# Altium PCB ABPG.PcbDoc (part 2 of 2)
Units mm, origin at the board's own origin, x right, y up, seen from the top; angles counter-clockwise.
Board outline 54.5 x 112.5 mm, 4 copper layers (Top Layer, Layer 1, Layer 2, Bottom Layer), stack 0.603 mm thick; 177 components, 78 nets, 524 pads, 877 vias.
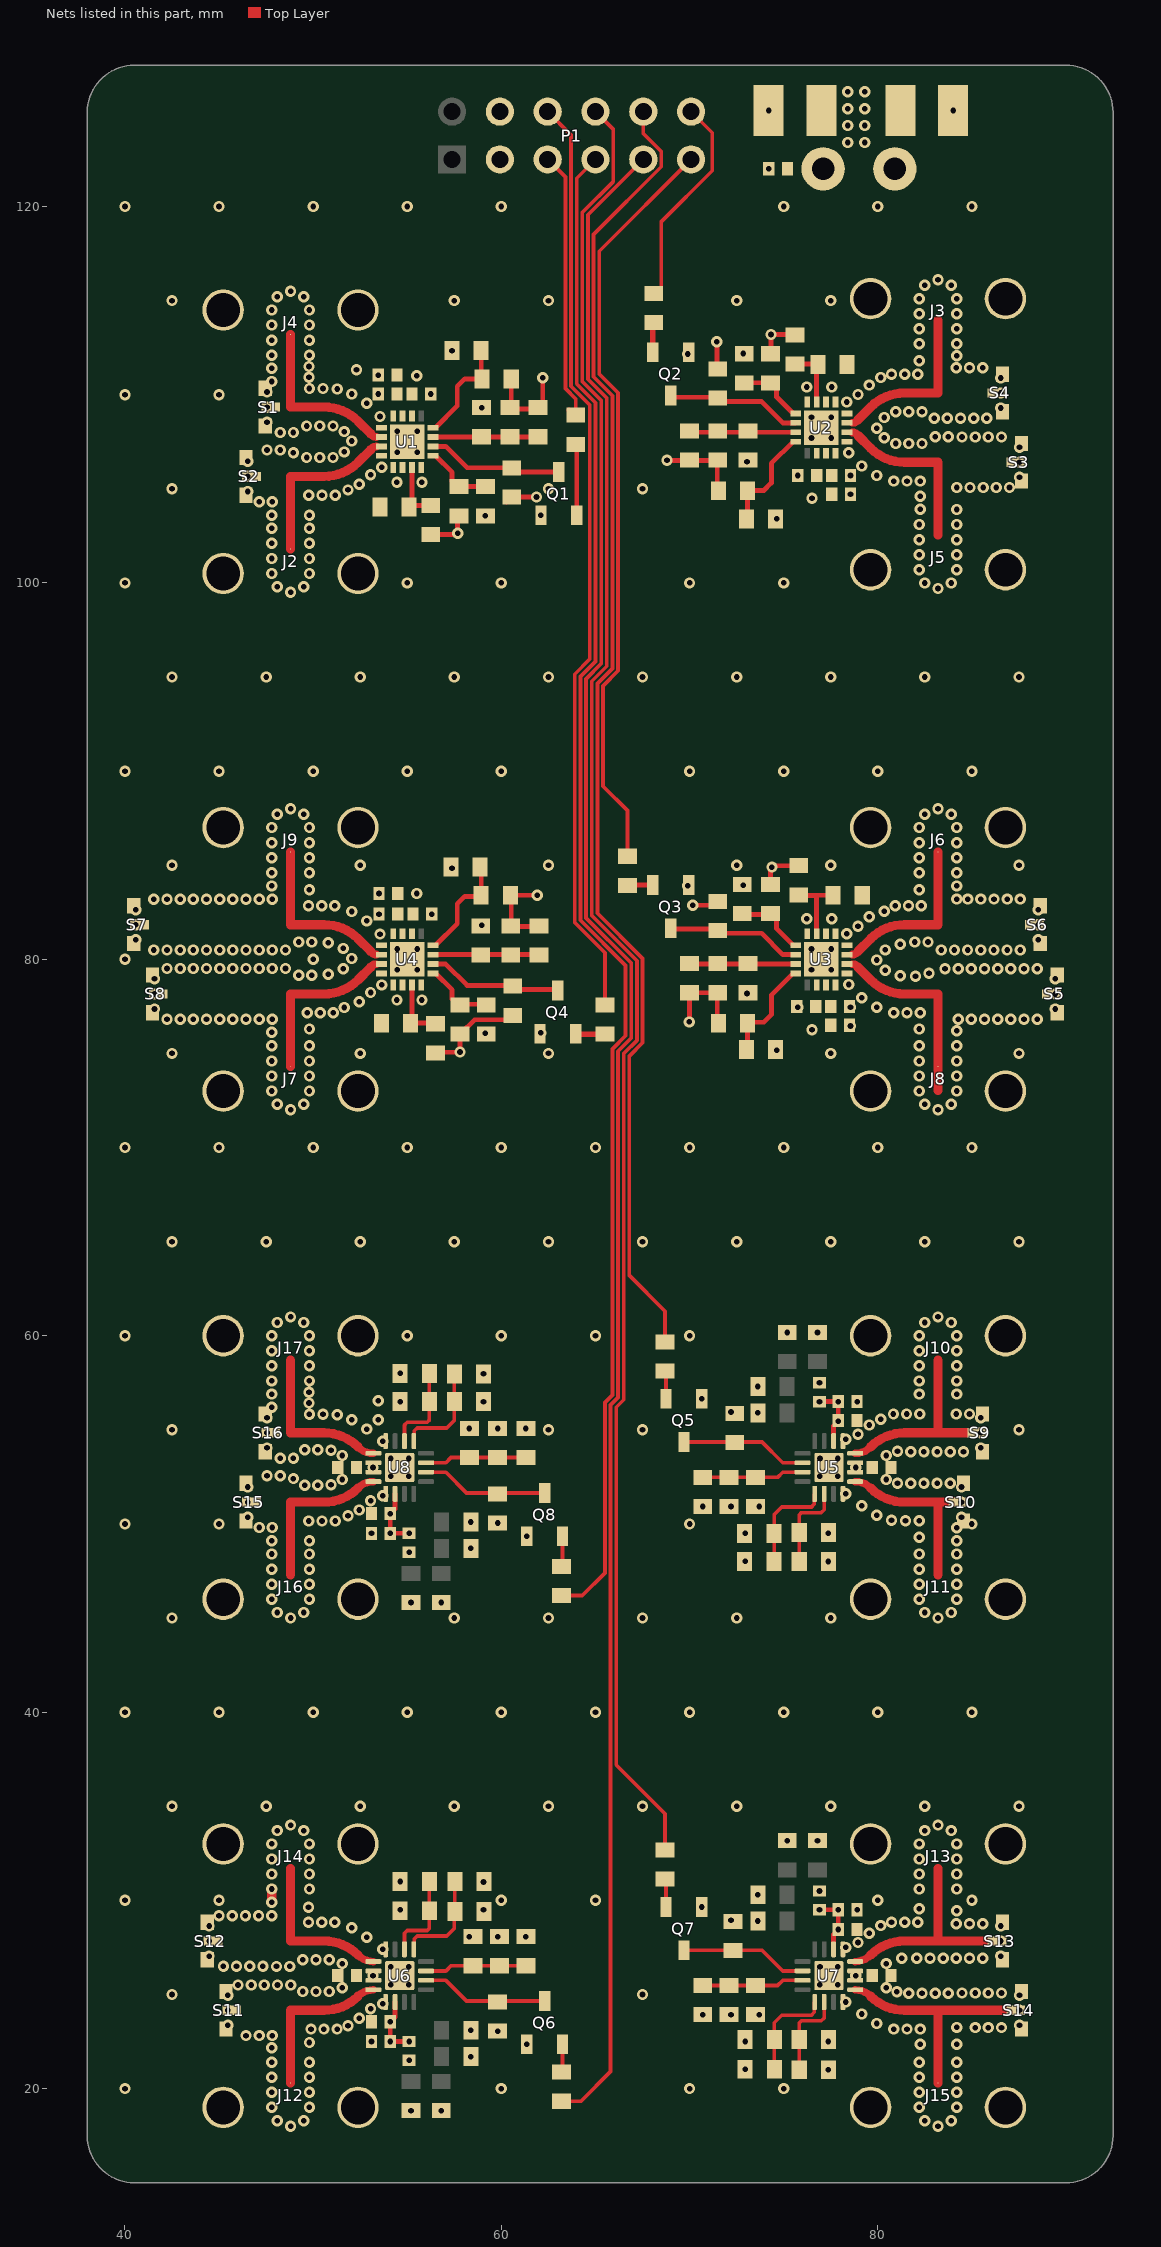
[diagram p4: the nets of this part, all layers, seen from the top]

## Via types
v1: diameter 0.6, hole 0.3, Top Layer to Bottom Layer, tented both sides, 877 vias

## Nets (pads, with @x,y where several pads share a name; then routed paths per layer and width w, separated by ;. In a path a pad name is that pad's centre, name@x,y a point inside that pad or via, vN(x,y) a via of type N, cw(c..) or ccw(c..) an arc to the next point about the centre after c; other vN are vias at no path point) (continued)
GND: C1.2 C2.2 C3.2 C4.2 C5.2 C6.2 C7.2 C8.2 C9.2 C12.2 C13.2 C14.2 C15.2 C16.2 C17.2 C24.2 C25.2 C26.2 C27.2 C28.2 C29.2 C30.2 C31.2 C32.2 C33.2 C34.2 C35.2 C36.2 C37.2 C38.2 C39.2 J1.2 J2.0 J3.0 J4.0 J5.0 J6.0 J7.0 J8.0 J9.0 J10.0 J11.0 J12.0 J13.0 J14.0 J15.0 J16.0 J17.0 P1.3 P1.4 Q1.1 Q2.1 Q3.1 Q4.1 Q5.1 Q6.1 Q7.1 Q8.1 R5.2 R6.2 R13.2 R14.2 R16.2 R17.2 R19.2 R20.2 R25.2 R26.2 R33.2 R34.2 R36.2 R37.2 R39.2 R40.2 R43.2 R44.1 R45.1 R46.2 R52.2 R55.2 R56.1 R57.1 R58.2 R63.2 R64.1 R68.2 R69.1 R70.2 R76.2 R79.2 R80.1 R81.1 R82.2 R88.2 S1.0 S2.0 S3.0 S4.0 S5.0 S6.0 S7.0 S8.0 S9.0 S10.0 S11.0 S12.0 S13.0 S14.0 S15.0 S16.0 U1.9 U1.12 U1.13 U1.14 U1.16 U2.9 U2.12 U2.13 U2.14 U2.16 U3.9 U3.12 U3.13 U3.14 U3.16 U4.9 U4.12 U4.13 U4.14 U4.16 U5.8 U5.13 U6.8 U6.13 U7.8 U7.13 U8.8 U8.13 | length 0.7
  Top Layer w0.5: v1(47.8,29.9) v1(47.8,30.6)
  other v1: 48.8,18 83.2,18 48.093,18.293 49.507,18.293 82.493,18.293 83.907,18.293 56.808,18.825 47.8,19 49.8,19 82.2,19 84.2,19 47.8,19.8 49.8,19.8 82.2,19.8 84.2,19.8 40,20 60,20 70,20 75,20 47.8,20.6 49.8,20.6 82.2,20.6 84.2,20.6 77.376,21.001 72.95,21.025 47.8,21.4 49.8,21.4 82.2,21.4 84.2,21.4 55.1,21.5 47.8,22.175 61.35,22.35 82.25,22.36 84.2,22.35 49.8,22.45 53.1,22.5 46.43,22.815 47.13,22.815 47.83,22.815 58.375,23.1 49.885,23.16 50.57,23.16 51.27,23.16 80.85,23.16 81.55,23.16 82.25,23.16 84.2,23.25 85.17,23.24 85.87,23.24 86.57,23.24 51.85,23.34 45.47,23.36 87.53,23.36 79.95,23.46 52.45,23.74 73.7,23.925 79.15,23.96 45.47,24.16 87.53,24.16 53.05,24.24 53.7,24.5 78.3,24.6 45.47,24.96 87.53,24.96 42.5,25 67.5,25 81.65,25.06 82.35,25.06 83.05,25.06 83.75,25.06 84.47,25.08 85.17,25.08 85.87,25.08 86.57,25.08 81.016,25.139 49.45,25.16 50.15,25.16 50.85,25.16 51.55,25.36 80.45,25.36 46.005,25.505 46.705,25.505 47.405,25.505 48.105,25.505 48.805,25.505 45.23,26.495 45.93,26.495 46.63,26.495 47.33,26.495 48.05,26.49 48.75,26.49 51.55,26.64 80.45,26.64 49.45,26.84 50.15,26.84 50.85,26.84 81.27,26.92 82.07,26.92 82.77,26.92 83.47,26.92 84.17,26.92 84.87,26.92 85.57,26.92 44.47,27.04 86.53,27.04 53.7,27.4 78.3,27.5 78.95,27.76 44.47,27.84 86.53,27.84 52.85,28.04 58.3,28.075 79.55,28.26 52.05,28.54 44.47,28.64 80.15,28.66 86.53,28.64 84.17,28.76 84.87,28.76 85.57,28.76 49.75,28.84 50.45,28.84 51.15,28.84 80.73,28.84 81.43,28.84 82.115,28.84 73.625,28.9 45,29.185 45.7,29.185 46.4,29.185 47.1,29.185 47.8,29.185 84.2,29.45 78.9,29.5 82.2,29.55 49.75,29.64 70.65,29.65 40,30 45,30 60,30 65,30 80,30 85,30 76.9,30.5 49.8,30.6 82.2,30.6 84.2,30.6 59.05,30.975 54.624,30.999 47.8,31.4 49.8,31.4 82.2,31.4 84.2,31.4 47.8,32.2 49.8,32.2 82.2,32.2 84.2,32.2 47.8,33 49.8,33 82.2,33 84.2,33 75.192,33.175 48.093,33.707 49.507,33.707 82.493,33.707 83.907,33.707 48.8,34 83.2,34 42.5,35 47.5,35 52.5,35 57.5,35 62.5,35 67.5,35 72.5,35 77.5,35 82.5,35 87.5,35 40,40 45,40 50,40 55,40 60,40 65,40 70,40 75,40 80,40 85,40 42.5,45 48.8,45 57.5,45 62.5,45 67.5,45 72.5,45 77.5,45 83.2,45 48.093,45.293 49.507,45.293 82.493,45.293 83.907,45.293 56.808,45.825 47.8,46 49.8,46 82.2,46 84.2,46 47.8,46.8 49.8,46.8 82.2,46.8 84.2,46.8 47.8,47.6 49.8,47.6 82.2,47.6 84.2,47.6 77.376,48.001 72.95,48.025 47.8,48.4 49.8,48.4 82.2,48.4 84.2,48.4 55.1,48.5 47.8,49.1 49.8,49.1 84.2,49.1 82.2,49.3 61.35,49.35 53.1,49.5 47.13,49.81 47.83,49.81 84.2,49.8 40,50 45,50 70,50 85,50 58.375,50.1 49.77,50.16 50.47,50.16 51.17,50.16 81.475,50.175 82.2,50.175 80.725,50.2 46.53,50.36 84.45,50.36 51.85,50.44 79.95,50.46 52.45,50.74 73.7,50.925 79.15,50.96 46.53,51.16 84.45,51.16 53.05,51.24 53.7,51.5 78.3,51.6 46.53,51.96 84.45,51.96 49.55,52.06 50.25,52.06 50.95,52.085 81.05,52.16 81.75,52.16 82.45,52.16 83.15,52.16 83.85,52.16 51.55,52.36 80.45,52.36 48.95,52.41 47.55,52.56 48.25,52.56 48.25,53.49 48.95,53.49 51.55,53.64 80.45,53.64 81.05,53.86 81.75,53.84 82.45,53.84 83.15,53.84 83.85,53.84 84.55,53.84 50.95,53.915 49.55,53.94 50.25,53.94 47.55,54.04 85.47,54.04 53.7,54.4 78.3,54.5 78.95,54.76 47.55,54.84 85.47,54.84 42.5,55 62.5,55 67.5,55 87.5,55 52.85,55.04 58.3,55.075 79.55,55.26 52.05,55.54 53.45,55.54 80.15,55.56 47.55,55.64 85.47,55.64 51.275,55.8 49.8,55.825 50.525,55.825 80.83,55.84 81.53,55.84 82.23,55.84 84.17,55.84 84.87,55.84 73.625,55.9 47.8,56.2 49.775,56.425 78.9,56.5 53.45,56.54 70.65,56.65 47.8,56.9 82.2,56.9 84.2,56.9 49.775,57 76.9,57.5 47.8,57.6 49.8,57.6 82.2,57.6 84.2,57.6 59.05,57.975 54.624,57.999 47.8,58.4 49.8,58.4 82.2,58.4 84.2,58.4 47.8,59.2 49.8,59.2 82.2,59.2 84.2,59.2 40,60 47.8,60 49.8,60 55,60 60,60 65,60 70,60 82.2,60 84.2,60 75.192,60.175 48.093,60.707 49.507,60.707 82.493,60.707 83.907,60.707 48.8,61 83.2,61 42.5,65 47.5,65 52.5,65 57.5,65 62.5,65 67.5,65 72.5,65 77.5,65 82.5,65 87.5,65 40,70 45,70 50,70 55,70 60,70 65,70 70,70 75,70 80,70 85,70 48.8,72 83.2,72 48.093,72.293 49.507,72.293 82.493,72.293 83.907,72.293 47.8,73 49.8,73 82.2,73 84.2,73 47.8,73.8 49.8,73.8 82.2,73.8 84.2,73.8 47.8,74.6 49.8,74.6 82.2,74.6 84.2,74.6 42.5,75 52.5,75 62.5,75 77.5,75 87.5,75 74.625,75.16 47.8,75.4 49.8,75.4 82.2,75.4 84.2,75.4 59.15,76.065 62.1,76.09 47.8,76.125 84.2,76.2 49.8,76.3 82.2,76.3 78.55,76.46 42.23,76.81 42.93,76.81 43.63,76.81 44.33,76.81 45.03,76.81 45.73,76.81 46.43,76.81 47.13,76.81 47.83,76.81 84.27,76.815 84.97,76.815 85.67,76.815 86.37,76.815 87.07,76.815 87.77,76.815 88.47,76.815 49.685,77.16 50.37,77.16 51.07,77.16 80.85,77.16 81.55,77.16 82.25,77.16 41.57,77.36 89.43,77.36 51.65,77.44 75.75,77.46 78.55,77.46 79.95,77.46 52.45,77.74 54.45,77.84 55.777,77.84 79.15,77.96 41.57,78.16 89.43,78.16 73.05,78.185 53.05,78.24 53.65,78.64 78.45,78.66 41.57,78.96 89.43,78.96 82,79.1 81.2,79.12 49.23,79.16 49.93,79.16 50.8,79.2 82.72,79.255 80.4,79.42 42.23,79.51 42.93,79.51 43.63,79.51 44.33,79.51 45.03,79.51 45.73,79.51 46.43,79.51 47.13,79.51 47.83,79.51 48.53,79.51 51.6,79.5 83.57,79.505 84.27,79.505 84.97,79.505 85.67,79.505 86.37,79.505 87.07,79.505 87.77,79.505 88.47,79.505 79.95,79.96 40,80 50,80 52.05,80.04 41.53,80.495 42.23,80.495 42.93,80.495 43.63,80.495 44.33,80.495 45.03,80.495 45.73,80.495 46.43,80.495 47.13,80.495 47.83,80.495 48.53,80.495 80.4,80.5 83.37,80.495 84.07,80.495 84.77,80.495 85.47,80.495 86.17,80.495 86.87,80.495 87.57,80.495 51.6,80.58 81.2,80.8 50.8,80.88 49.23,80.92 49.93,80.92 81.97,80.92 82.67,80.92 40.57,81.04 88.53,81.04 53.55,81.34 78.35,81.36 78.95,81.76 58.95,81.815 40.57,81.84 88.53,81.84 52.85,82.04 76.223,82.16 77.55,82.16 79.55,82.26 53.5,82.4 56.3,82.4 52.05,82.54 80.35,82.56 40.57,82.64 88.53,82.64 49.75,82.84 50.45,82.84 51.15,82.84 80.93,82.84 81.63,82.84 82.315,82.84 41.53,83.185 42.23,83.185 42.93,83.185 43.63,83.185 44.33,83.185 45.03,83.185 45.73,83.185 46.43,83.185 47.13,83.185 47.83,83.185 84.2,83.2 84.775,83.2 85.475,83.2 86.175,83.2 86.875,83.2 87.575,83.2 53.5,83.5 49.8,83.7 82.2,83.7 47.8,83.9 84.2,83.9 69.9,83.91 72.85,83.935 47.8,84.6 49.8,84.6 82.2,84.6 84.2,84.6 57.375,84.84 42.5,85 52.5,85 62.5,85 72.5,85 77.5,85 87.5,85 47.8,85.4 49.8,85.4 82.2,85.4 84.2,85.4 47.8,86.2 49.8,86.2 82.2,86.2 84.2,86.2 47.8,87 49.8,87 82.2,87 84.2,87 48.093,87.707 49.507,87.707 82.493,87.707 83.907,87.707 48.8,88 83.2,88 40,90 45,90 50,90 55,90 60,90 70,90 75,90 80,90 85,90 42.5,95 47.5,95 52.5,95 57.5,95 62.5,95 67.5,95 72.5,95 77.5,95 82.5,95 87.5,95 48.8,99.5 83.2,99.7 48.093,99.793 49.507,99.793 40,100 55,100 60,100 70,100 75,100 82.493,99.993 83.907,99.993 47.8,100.5 49.8,100.5 82.2,100.7 84.2,100.7 47.8,101.3 49.8,101.3 82.2,101.5 84.2,101.5 47.8,102.1 49.8,102.1 82.2,102.3 84.2,102.3 47.8,102.9 49.8,102.9 82.2,103.1 84.2,103.1 74.625,103.41 59.15,103.565 62.1,103.59 47.8,103.6 49.8,103.6 82.25,103.91 84.2,103.9 47.13,104.31 47.83,104.31 82.25,104.61 49.77,104.66 50.47,104.66 51.17,104.66 78.55,104.71 46.53,104.86 51.85,104.94 42.5,105 62.5,105 67.5,105 84.2,105.065 84.9,105.065 85.6,105.065 86.3,105.065 87,105.065 52.45,105.24 54.45,105.34 55.777,105.34 80.85,105.41 81.55,105.41 82.25,105.41 87.53,105.61 46.53,105.66 75.75,105.71 78.55,105.71 79.95,105.71 53.05,105.74 53.65,106.14 79.15,106.21 87.53,106.41 73.05,106.435 46.53,106.46 49.65,106.66 50.35,106.66 51.05,106.66 48.95,106.91 78.45,106.91 51.65,106.96 47.55,107.06 48.25,107.06 87.53,107.21 80.95,107.41 81.65,107.41 82.35,107.41 52.05,107.54 80.35,107.71 84.47,107.755 85.17,107.755 85.87,107.755 86.57,107.755 83.05,107.76 83.75,107.76 48.25,107.99 48.95,107.99 51.65,108.04 79.95,108.21 49.65,108.34 50.35,108.34 51.05,108.34 47.55,108.54 82.995,108.745 83.695,108.745 84.395,108.745 85.095,108.745 85.795,108.745 80.35,108.79 53.55,108.84 80.95,109.09 81.65,109.09 82.35,109.09 86.53,109.29 58.95,109.315 47.55,109.34 52.85,109.54 78.35,109.61 40,110 45,110 78.95,110.01 52.05,110.04 53.45,110.04 56.25,110.04 86.53,110.09 47.55,110.14 51.275,110.3 49.8,110.325 50.525,110.325 76.223,110.41 77.55,110.41 79.55,110.51 47.8,110.7 86.53,110.89 49.775,110.925 80.15,110.91 53.45,111.04 80.73,111.09 81.43,111.09 82.115,111.09 52.3,111.325 47.8,111.4 84.17,111.435 84.87,111.435 85.57,111.435 49.775,111.5 82.2,111.8 84.2,112.075 47.8,112.1 49.8,112.1 69.9,112.16 72.85,112.185 57.375,112.34 82.2,112.7 84.2,112.7 47.8,112.9 49.8,112.9 82.2,113.5 84.2,113.5 47.8,113.7 49.8,113.7 82.2,114.3 84.2,114.3 47.8,114.5 49.8,114.5 42.5,115 57.5,115 62.5,115 72.5,115 77.5,115 82.2,115.1 84.2,115.1 48.093,115.207 49.507,115.207 48.8,115.5 82.493,115.807 83.907,115.807 83.2,116.1 40,120 45,120 50,120 55,120 60,120 75,120 80,120 85,120 74.2,122 74.2,125.1 84,125.1
NetC10_2: C10.2 R3.1 R5.1 U1.3 | length 5.6
  Top Layer w0.254: U1.3@56.36,107.75 61.935,107.75 C10.2@61.95,107.765
NetC11_2: C11.2 R4.1 R6.1 U2.3 | length 5.6
  Top Layer w0.254: C11.2@70.065,108 U2.3@75.64,108
NetC18_2: C18.2 R23.1 R25.1 U3.3 | length 5.6
  Top Layer w0.254: C18.2@70.065,79.75 71.5,79.75 73.1,79.75 U3.3@75.64,79.75
NetC19_2: C19.2 R24.1 R26.1 U4.3 | length 5.6
  Top Layer w0.254: U4.3@56.36,80.25 C19.2@61.935,80.25
NetC20_1: C20.1 R51.1 R52.1 U5.3 | length 5.4
  Top Layer w0.2: C20.1@70.7,52.475 74.675,52.475 74.95,52.75 U5.3@76,52.75
NetC21_1: C21.1 R67.1 R68.1 U6.3 | length 5.4
  Top Layer w0.2: U6.3@56,26.25 57.05,26.25 57.325,26.525 R68.1@58.5,26.525 R67.1@59.9,26.525 C21.1@61.3,26.525
NetC22_1: C22.1 R75.1 R76.1 U7.3 | length 5.4
  Top Layer w0.2: C22.1@70.7,25.475 R75.1@72.1,25.475 73.6,25.475 74.675,25.475 74.95,25.75 U7.3@76,25.75
NetC23_1: C23.1 R87.1 R88.1 U8.3 | length 5.4
  Top Layer w0.2: U8.3@56,53.25 57.05,53.25 57.325,53.525 58.4,53.525 R87.1@59.8,53.525 C23.1@61.3,53.525
NetJ2_1: J2.1 S2.1 U1.11 | length 8.9
  Top Layer w0.41: 53.055,107.079 cw(c53.35,106.9) U1.11@53.35,107.245
  Top Layer w0.49: J2.1@48.8,101.8 48.8,105.66 50.584,105.66 ccw(c50.584,108.2) 52.38,106.404 53.055,107.079
NetJ3_1: J3.1 S4.1 U2.11 | length 8.9
  Top Layer w0.41: U2.11@78.65,108.505 ccw(c78.65,108.85) 78.945,108.671
  Top Layer w0.49: 78.945,108.671 79.62,109.346 cw(c81.416,107.55) 81.416,110.09 83.2,110.09 83.2,113.95
NetJ4_1: J4.1 S1.1 U1.10 | length 8.9
  Top Layer w0.41: 53.055,107.921 ccw(c53.35,108.1) U1.10@53.35,107.755
  Top Layer w0.49: J4.1@48.8,113.2 48.8,109.34 50.584,109.34 cw(c50.584,106.8) 52.38,108.596 53.055,107.921
NetJ5_1: J5.1 S3.1 U2.10 | length 8.9
  Top Layer w0.41: U2.10@78.65,107.995 cw(c78.65,107.65) 78.945,107.829
  Top Layer w0.49: 78.945,107.829 79.62,107.154 ccw(c81.416,108.95) 81.416,106.41 83.2,106.41 83.2,102.55
NetJ6_1: J6.1 S6.1 U3.11 | length 8.9
  Top Layer w0.41: U3.11@78.65,80.255 ccw(c78.65,80.6) 78.945,80.421
  Top Layer w0.49: 78.945,80.421 79.62,81.096 cw(c81.416,79.3) 81.416,81.84 83.2,81.84 J6.1@83.2,85.7
NetJ7_1: J7.1 S8.1 U4.11 | length 8.9
  Top Layer w0.41: 53.055,79.579 cw(c53.35,79.4) U4.11@53.35,79.745
  Top Layer w0.49: J7.1@48.8,74.3 48.8,78.16 50.584,78.16 ccw(c50.584,80.7) 52.38,78.904 53.055,79.579
NetJ8_1: J8.1 S5.1 U3.10 | length 10.2
  Top Layer w0.41: U3.10@78.65,79.745 cw(c78.65,79.4) 78.945,79.579
  Top Layer w0.49: 78.945,79.579 79.62,78.904 ccw(c81.416,80.7) 81.416,78.16 83.2,78.16 J8.1@83.2,74.3 83.2,73.025
NetJ9_1: J9.1 S7.1 U4.10 | length 8.9
  Top Layer w0.41: 53.055,80.421 ccw(c53.35,80.6) U4.10@53.35,80.255
  Top Layer w0.49: J9.1@48.8,85.7 48.8,81.84 50.584,81.84 cw(c50.584,79.3) 52.38,81.096 53.055,80.421
NetJ10_1: J10.1 S9.1 U5.12 | length 10.2
  Top Layer w0.4: U5.12@78.8,53.75 ccw(c78.8,54.894) 79.609,54.085
  Top Layer w0.49: 79.62,54.096 cw(c81.416,52.3) 81.416,54.84 83.2,54.84 ; J10.1@83.2,58.7 83.2,54.84 ; S9.1@84.84,54.84 83.2,54.84
NetJ11_1: J11.1 S10.1 U5.9 | length 9.4
  Top Layer w0.4: U5.9@78.8,52.25 cw(c78.8,51.106) 79.609,51.915
  Top Layer w0.49: 79.609,51.915 79.62,51.904 ccw(c81.416,53.7) 81.416,51.16 83.2,51.16 ; J11.1@83.2,47.3 83.2,51.16 ; S10.1@84,51.16 83.2,51.16
NetJ12_1: J12.1 S11.1 U6.12 | length 8.5
  Top Layer w0.4: 52.391,24.915 cw(c53.2,24.106) U6.12@53.2,25.25
  Top Layer w0.49: J12.1@48.8,20.3 48.8,24.16 50.584,24.16 ccw(c50.584,26.7) 52.38,24.904
NetJ13_1: J13.1 S13.1 U7.12 | length 11.3
  Top Layer w0.4: U7.12@78.8,26.75 ccw(c78.8,27.894) 79.609,27.085
  Top Layer w0.49: 79.62,27.096 cw(c81.416,25.3) 81.416,27.84 83.2,27.84 ; J13.1@83.2,31.7 83.2,27.84 ; S13.1@86,27.84 83.2,27.84
NetJ14_1: J14.1 S12.1 U6.9 | length 8.5
  Top Layer w0.4: 52.391,27.085 ccw(c53.2,27.894) U6.9@53.2,26.75
  Top Layer w0.49: J14.1@48.8,31.7 48.8,27.84 50.584,27.84 cw(c50.584,25.3) 52.38,27.096
NetJ15_1: J15.1 S14.1 U7.9 | length 12.3
  Top Layer w0.4: U7.9@78.8,25.25 cw(c78.8,24.106) 79.609,24.915
  Top Layer w0.49: 79.62,24.904 ccw(c81.416,26.7) 81.416,24.16 83.2,24.16 ; J15.1@83.2,20.3 83.2,24.16 ; S14.1@87,24.16 83.2,24.16
NetJ16_1: J16.1 S15.1 U8.12 | length 8.5
  Top Layer w0.4: 52.391,51.915 cw(c53.2,51.106) U8.12@53.2,52.25
  Top Layer w0.49: J16.1@48.8,47.3 48.8,51.16 50.584,51.16 ccw(c50.584,53.7) 52.38,51.904
NetJ17_1: J17.1 S16.1 U8.9 | length 8.5
  Top Layer w0.4: 52.391,54.085 ccw(c53.2,54.894) U8.9@53.2,53.75
  Top Layer w0.49: J17.1@48.8,58.7 48.8,54.84 50.584,54.84 cw(c50.584,52.3) 52.38,54.096
NetQ1_2: Q1.2 R1.1 | length 3.8
  Top Layer w0.254: R1.1@63.95,107.365 64,107.315 64,103.917 Q1.2@64,103.59
NetQ1_3: Q1.3 R11.1 U1.2 | length 7.3
  Top Layer w0.254: U1.2@56.36,107.25 57.04,107.25 58.175,106.115 R11.1@60.55,106.115 60.775,105.89 Q1.3@63.05,105.89
NetQ2_2: Q2.2 R2.1 | length 1.7
  Top Layer w0.3: Q2.2@68,112.2 Q2.2@68.05,112.25 68.05,113.775 R2.1@68.1,113.825
NetQ2_3: Q2.3 R12.1 U2.2 | length 7.3
  Top Layer w0.254: Q2.3@68.95,109.86 71.225,109.86 71.45,109.635 73.825,109.635 74.96,108.5 U2.2@75.64,108.5
NetQ3_2: Q3.2 R21.1 | length 1.4
  Top Layer w0.254: R21.1@66.7,83.925 66.725,83.95 Q3.2@68.05,83.95
NetQ3_3: Q3.3 R31.1 U3.2 | length 7.3
  Top Layer w0.254: Q3.3@68.95,81.61 71.225,81.61 71.45,81.385 73.825,81.385 74.96,80.25 U3.2@75.64,80.25
NetQ4_2: Q4.2 R22.1 | length 1.6
  Top Layer w0.3: Q4.2@63.95,76.05 63.975,76.025 R22.1@65.5,76.025
NetQ4_3: Q4.3 R32.1 U4.2 | length 7.3
  Top Layer w0.254: U4.2@56.36,79.75 57.04,79.75 58.175,78.615 60.55,78.615 60.775,78.39 Q4.3@63.05,78.39
NetQ5_2: Q5.2 R41.1 | length 1.5
  Top Layer w0.2: R41.1@68.7,58.125 68.75,58.075 Q5.2@68.75,56.65
NetQ5_3: Q5.3 R42.1 U5.2 | length 6.8
  Top Layer w0.2: Q5.3@69.7,54.35 73.85,54.35 74.95,53.25 U5.2@76,53.25
NetQ6_2: Q6.2 R53.1 | length 1.5
  Top Layer w0.2: R53.1@63.2,20.875 63.25,20.925 Q6.2@63.25,22.35
NetQ6_3: Q6.3 R54.1 U6.2 | length 6.8
  Top Layer w0.2: U6.2@56,25.75 57.05,25.75 58.15,24.65 Q6.3@62.3,24.65
NetQ7_2: Q7.2 R59.1 | length 1.5
  Top Layer w0.2: R59.1@68.7,31.125 68.75,31.075 Q7.2@68.75,29.65
NetQ7_3: Q7.3 R60.1 U7.2 | length 6.8
  Top Layer w0.2: Q7.3@69.7,27.35 71.5,27.35 72.3,27.35 73.85,27.35 74.95,26.25 U7.2@76,26.25
NetQ8_2: Q8.2 R77.1 | length 1.6
  Top Layer w0.2: R77.1@63.2,47.75 63.25,47.8 Q8.2@63.25,49.35
NetQ8_3: Q8.3 R78.1 U8.2 | length 6.8
  Top Layer w0.2: U8.2@56,52.75 57.05,52.75 58.15,51.65 Q8.3@62.3,51.65
NetR15_1: R15.1 R19.1 U1.15 | length 3.3
  Top Layer w0.254: R19.1@55.1,104.04 55.1,104.115 R19.1@55.25,104.115 ; U1.15@55.25,106.14 R19.1@55.25,104.115 ; R15.1@56.25,104.115 R19.1@55.25,104.115
NetR18_1: R18.1 R20.1 U2.15 | length 3
  Top Layer w0.254: R18.1@75.75,111.635 76.75,111.635 U2.15@76.75,109.61
NetR35_1: R35.1 R39.1 U3.15 | length 3.9
  Top Layer w0.254: R35.1@75.75,83.385 76.75,83.385 ; U3.15@76.75,81.36 76.75,83.385 ; R39.1@77.625,83.4 76.765,83.4 76.75,83.385
NetR38_1: R38.1 R40.1 U4.15 | length 3
  Top Layer w0.254: U4.15@55.25,78.64 55.25,76.615 R38.1@56.25,76.615
PULSE_DRIVE_1: P1.5 R1.2 | length 14.7
  Top Layer w0.2: P1.5@62.46,122.5 63.4,121.56 63.4,110.327 63.95,109.777 R1.2@63.95,108.915
  Top Layer w0.3: R1.2@63.6,109.165 63.85,108.915 R1.2@63.95,108.915
PULSE_DRIVE_2: P1.6 R22.2 | length 49.4
  Top Layer w0.2: P1.6@62.46,125.04 63.7,123.8 63.7,110.451 64.7,109.451 64.7,95.949 63.9,95.149 63.9,81.951 65.5,80.351 R22.2@65.5,77.575
PULSE_DRIVE_3: P1.12 R2.2 | length 11.5
  Top Layer w0.2: R2.2@68.1,115.375 68.2,115.375 68.5,115.675 68.5,119.2 71.2,121.9 71.2,123.92 P1.12@70.08,125.04
PULSE_DRIVE_4: P1.11 R21.2 | length 40.4
  Top Layer w0.2: R21.2@66.7,85.475 66.7,87.9 65.4,89.2 65.4,94.527 66.2,95.327 66.2,110.1 65.2,111.1 65.2,117.62 P1.11@70.08,122.5
  Top Layer w0.3: R21.2@66.7,85.475 R21.2@66.8,85.475
PULSE_DRIVE_5: P1.9 R59.2 | length 94.3
  Top Layer w0.2: P1.9@67.54,122.5 64.6,119.56 64.6,110.824 65.6,109.824 65.6,95.576 64.8,94.776 64.8,82.324 65.712,81.412 67.2,79.924 67.2,75.694 66.5,74.994 66.5,56.6 66.1,56.2 66.1,37.2 68.7,34.6 R59.2@68.7,32.675
PULSE_DRIVE_6: P1.7 R77.2 | length 80.5
  Top Layer w0.2: R77.2@63.2,46.2 64.3,46.2 65.5,47.4 65.5,56.449 65.9,56.849 65.9,75.242 66.6,75.942 66.6,79.676 64.2,82.076 64.2,95.024 65,95.824 65,109.576 64,110.576 64,121.5 P1.7@65,122.5
PULSE_DRIVE_7: P1.10 R41.2 | length 70.1
  Top Layer w0.2: P1.10@67.54,125.04 67.54,123.872 68.49,122.922 68.49,122.106 64.9,118.516 64.9,110.949 65.9,109.949 65.9,95.451 65.1,94.651 65.1,82.449 67.5,80.049 67.5,75.569 66.8,74.869 66.8,63.2 68.7,61.3 R41.2@68.7,59.675
PULSE_DRIVE_8: P1.8 R53.2 | length 110.7
  Top Layer w0.2: R53.2@63.2,19.325 64.225,19.325 65.8,20.9 65.8,56.324 66.2,56.724 66.2,75.118 66.9,75.818 66.9,79.8 64.5,82.2 64.5,94.9 65.3,95.7 65.3,109.7 64.3,110.7 64.3,119.684 65.95,121.334 65.95,124.09 P1.8@65,125.04
S1_N: R70.1 R74.1 U7.6 | length 4.8
  Top Layer w0.2: R70.1@75.826,21.001 75.826,22.552 75.826,23.483 75.943,23.6 77,23.6 77.15,23.75 U7.6@77.15,24.6
S1_P: R69.2 R73.2 U7.5 | length 5.4
  Top Layer w0.2: R69.2@74.5,21.025 74.5,23.5 74.9,23.9 76.472,23.9 76.625,24.053 U7.5@76.625,24.575
S2_N: R82.1 R86.1 U8.6 | length 4.8
  Top Layer w0.2: U8.6@54.85,54.4 54.85,55.25 55,55.4 56.057,55.4 56.174,55.517 56.174,56.448 R82.1@56.174,57.999
S2_P: R81.2 R85.2 U8.5 | length 5.4
  Top Layer w0.2: U8.5@55.375,54.425 55.375,54.947 55.528,55.1 57.1,55.1 57.5,55.5 R81.2@57.5,57.975
S3_N: R46.1 R50.1 U5.6 | length 4.8
  Top Layer w0.2: R46.1@75.825,48 75.826,48.001 R50.1@75.826,49.552 75.826,50.483 75.943,50.6 77,50.6 77.15,50.75 U5.6@77.15,51.6
S3_P: R45.2 R49.2 U5.5 | length 5.4
  Top Layer w0.2: R45.2@74.475,48 74.5,48.025 74.5,50.5 74.9,50.9 76.472,50.9 76.625,51.053 76.625,51.575 U5.5@76.65,51.6
S4_N: R58.1 R66.1 U6.6 | length 4.8
  Top Layer w0.2: U6.6@54.85,27.4 54.85,28.25 55,28.4 56.057,28.4 56.174,28.517 R66.1@56.174,29.448 R58.1@56.174,30.999
S4_P: R57.2 R65.2 U6.5 | length 5.4
  Top Layer w0.2: U6.5@55.375,27.425 55.375,27.947 55.528,28.1 57.1,28.1 57.5,28.5 R65.2@57.5,29.4 ; R65.2@57.525,29.4 R57.2@57.525,31
VEE: C1.1 C2.1 C3.1 C4.1 C5.1 C6.1 C7.1 C8.1 C9.1 C10.1 C11.1 C12.1 C13.1 C14.1 C15.1 C16.1 C17.1 C18.1 C19.1 C20.2 C21.2 C22.2 C23.2 C24.1 C25.1 C26.1 C27.1 C28.1 C29.1 C30.1 C31.1 C32.1 C33.1 C34.1 C35.1 C36.1 C37.1 C38.1 C39.1 J1.1 R3.2 R4.2 R7.1 R8.1 R9.1 R10.1 R11.2 R12.2 R15.2 R18.2 R23.2 R24.2 R27.1 R28.1 R29.1 R30.1 R31.2 R32.2 R35.2 R38.2 R42.2 R47.2 R48.1 R49.1 R50.2 R51.2 R54.2 R60.2 R61.2 R62.1 R65.1 R66.2 R67.2 R71.2 R72.1 R73.1 R74.2 R75.2 R78.2 R83.2 R84.1 R85.1 R86.2 R87.2 U1.6 U1.7 U1.8 U1.17 U2.6 U2.7 U2.8 U2.17 U3.6 U3.7 U3.8 U3.17 U4.6 U4.7 U4.8 U4.17 U5.10 U5.11 U5.14 U5.17 U6.10 U6.11 U6.14 U6.17 U7.10 U7.11 U7.14 U7.17 U8.10 U8.11 U8.14 U8.17 | length 48.5
  Top Layer w0.254: C29.1@54.1,23.5 v1(54.1,22.5) v1(55.1,22.5) ; v1(54.1,23.55) 54.35,23.8 U6.14@54.35,24.6 ; C35.1@54.1,50.5 v1(54.1,49.5) v1(55.1,49.5) ; v1(54.1,50.55) 54.35,50.8 U8.14@54.35,51.6 ; R38.2@56.25,75.065 57.8,75.065 v1@57.81,75.075 ; R15.2@56.25,102.565 57.601,102.565 v1(57.676,102.639) 57.676,103.491 R7.1@57.75,103.565 ; v1(57.8,75.075) R29.1@57.8,76.025 ; R29.1@57.85,76.065 58.577,76.792 60.277,76.792 R32.2@60.55,77.065 ; R11.2@60.277,104.292 R11.2@60.55,104.565 v1(61.863,104.565) ; R30.1@60.475,83.4 v1(61.9,83.4) ; R24.2@60.525,81.74 C19.1@62,81.74 ; R24.2@60.525,81.89 R30.1@60.525,83.34 ; R8.1@60.525,110.84 60.525,109.39 R3.2@60.45,109.315 60.525,109.24 C10.1@61.95,109.24 ; C10.1@61.95,109.315 62.2,109.565 v1(62.2,110.9) ; v1(68.8,106.51) R4.2@71.475,106.51 ; v1(69.975,76.675) 70,76.7 C18.1@70,78.225 71.36,78.225 71.475,78.11 R28.1@71.475,76.66 ; v1(70.175,82.875) 71.3,82.875 R31.2@71.5,83.075 ; v1(71.45,112.81) 71.45,111.185 R12.2@71.723,111.458 ; R10.1@71.475,104.91 R4.2@71.475,106.36 ; R27.1@74.3,83.975 74.3,84.826 74.449,84.975 R35.2@75.8,84.975 ; R9.1@74.3,112.175 74.325,112.2 v1(74.325,113.2) 75.735,113.2 R18.2@75.75,113.185 ; v1(76.9,29.5) v1(77.9,29.5) C32.1@77.9,28.5 ; v1(76.9,56.5) v1(77.9,56.5) C26.1@77.9,55.5 v1(77.9,55.45) 77.65,55.2 U5.14@77.65,54.4 ; U7.14@77.65,27.4 77.65,28.2 v1(77.9,28.45)
  other v1: 55.2,18.825 58.375,21.7 72.95,22.5 77.375,22.5 59.8,23.05 70.7,23.925 72.2,23.925 54.125,25.525 55.075,25.525 76.925,25.525 77.875,25.525 53.175,26 78.825,26 54.125,26.475 55.075,26.475 76.925,26.475 77.875,26.475 59.8,28.075 61.3,28.075 72.2,28.95 54.625,29.5 59.05,29.5 73.625,30.3 76.8,33.175 55.2,45.825 58.375,48.7 72.95,49.5 77.375,49.5 59.8,50.05 70.7,50.925 72.2,50.925 54.125,52.525 55.075,52.525 76.925,52.525 77.875,52.525 53.175,53 78.825,53 54.125,53.475 55.075,53.475 76.925,53.475 77.875,53.475 59.8,55.075 61.3,55.075 72.2,55.95 54.625,56.5 59.05,56.5 73.625,57.3 76.8,60.175 76.5,76.25 54.475,79.45 55.525,79.45 76.475,79.45 77.525,79.45 54.475,80.55 55.525,80.55 76.475,80.55 77.525,80.55 55.5,83.5 74.374,84.901 76.5,104.5 54.475,106.95 55.525,106.95 76.475,107.7 77.525,107.7 54.475,108.05 55.525,108.05 76.475,108.8 77.525,108.8 55.5,111 78.4,123.4 79.3,123.4 78.4,124.3 79.3,124.3 78.4,125.2 79.3,125.2 78.4,126.1 79.3,126.1
VT1_N: R8.2 R14.1 U1.4 | length 5.8
  Top Layer w0.254: U1.4@56.36,108.25 56.5,108.25 57.65,109.4 57.65,110.44 58.05,110.84 R8.2@58.975,110.84 58.925,110.89 R14.1@58.925,112.34
VT1_P: R7.2 R13.1 U1.1 | length 3.8
  Top Layer w0.254: U1.1@56.36,106.75 56.5,106.75 57.377,105.873 57.377,105.388 57.65,105.115 R7.2@57.75,105.115 R13.1@59.15,105.115
VT2_N: R10.2 R17.1 U2.4 | length 5.6
  Top Layer w0.254: R10.2@73.025,104.91 73.95,104.91 74.35,105.31 74.35,106.35 U2.4@75.5,107.5 ; R17.1@73.075,103.41 R10.2@73.075,104.86
VT2_P: R9.2 R16.1 U2.1 | length 3.6
  Top Layer w0.254: R16.1@72.85,110.635 74.25,110.635 74.35,110.635 74.623,110.362 74.623,109.877 U2.1@75.5,109
VT3_N: R28.2 R34.1 U3.4 | length 5.6
  Top Layer w0.254: R28.2@73.025,76.66 73.95,76.66 74.35,77.06 74.35,78.1 U3.4@75.5,79.25 ; R34.1@73.075,75.16 R28.2@73.075,76.61
VT3_P: R27.2 R33.1 U3.1 | length 3.6
  Top Layer w0.254: R33.1@72.85,82.385 74.25,82.385 74.35,82.385 74.623,82.112 74.623,81.627 U3.1@75.5,80.75
VT4_N: R30.2 R37.1 U4.4 | length 5.6
  Top Layer w0.254: U4.4@56.5,80.75 57.65,81.9 57.65,82.94 58.05,83.34 R30.2@58.975,83.34 ; R30.2@58.925,83.39 R37.1@58.925,84.84
VT4_P: R29.2 R36.1 U4.1 | length 3.6
  Top Layer w0.254: U4.1@56.5,79.25 57.377,78.373 57.377,77.888 57.65,77.615 57.75,77.615 R36.1@59.15,77.615
pads on no net: P1.1 P1.2 U1.5 U2.5 U3.5 U4.5 U5.1 U5.4 U5.7 U6.1 U6.4 U6.7 U7.1 U7.4 U7.7 U8.1 U8.4 U8.7

## Polygon pours and split planes (outlines as drawn)
VEE on Top Layer "VEE_L01_P021" (solid, pour order 21): 80.2,52.5 80.2,53.5 78.3,53.5 78.3,53.9 77.9,53.9 77.9,54.9 78.3,54.9 78.3,56.9 76.4,56.9 76.4,56.2 77.4,55.2 77.4,52.5
VEE on Top Layer "VEE_L01_P022" (solid, pour order 22): 80.2,25.5 80.2,26.5 78.3,26.5 78.3,26.9 77.9,26.9 77.9,27.9 78.3,27.9 78.3,29.9 76.4,29.9 76.4,29.2 77.4,28.2 77.4,25.5
GND on Top Layer "GND_L01_P028" (solid, pour order 28): 40.54,15 cw(c40.54,17.54) 38,17.54 38,124.96 cw(c40.54,124.96) 40.54,127.5 89.96,127.5 cw(c89.96,124.96) 92.5,124.96 92.5,17.54 cw(c89.96,17.54) 89.96,15
VEE on Top Layer "VEE_L01_P024" (solid, pour order 24): 74.8,120.5 74.8,126.6 75.6,127.4 82.4,127.4 82.4,123.7 82.1,123.4 80.6,123.4 77.7,120.5
VEE on Top Layer "VEE_L01_P023" (solid, pour order 23): 51.8,26.5 51.8,25.5 53.7,25.5 53.7,25.1 54.1,25.1 54.1,24.1 53.7,24.1 53.7,22.1 55.6,22.1 55.6,22.8 54.6,23.8 54.6,26.5
VEE on Top Layer "VEE_L01_P020" (solid, pour order 20): 51.75,53.5 51.75,52.5 53.7,52.5 53.7,52.1 54.1,52.1 54.1,51.1 53.7,51.1 53.7,49.1 55.6,49.1 55.6,49.8 54.6,50.8 54.6,53.5
VEE on Top Layer "VEE_L01_P012" (solid, pour order 12): 78,108.25 78,103.725 76,103.725 76,108.25
VEE on Top Layer "VEE_L01_P014" (solid, pour order 14): 78,81.02 76.1,81.02 76.1,75.3 76.1,75.5 78,75.5
VEE on Top Layer "VEE_L01_P015" (solid, pour order 15): 54,78.98 55.9,78.98 55.9,84.7 55.9,84.5 54,84.5
VEE on Top Layer "VEE_L01_P013" (solid, pour order 13): 55.95,111.54 54.05,111.54 54.05,106.54 55.95,106.54
GND on Layer 1 "GND_L02_P025" (solid, pour order 25): 40.54,15 cw(c40.54,17.54) 38,17.54 38,124.96 cw(c40.54,124.96) 40.54,127.5 89.96,127.5 cw(c89.96,124.96) 92.5,124.96 92.5,17.54 cw(c89.96,17.54) 89.96,15
GND on Bottom Layer "GND_L04_P027" (solid, pour order 27): 40.54,15 cw(c40.54,17.54) 38,17.54 38,124.96 cw(c40.54,124.96) 40.54,127.5 89.96,127.5 cw(c89.96,124.96) 92.5,124.96 92.5,17.54 cw(c89.96,17.54) 89.96,15
VEE on Layer 2 "VEE_L03_P026" (solid, pour order 26): 40.54,15 cw(c40.54,17.54) 38,17.54 38,124.96 cw(c40.54,124.96) 40.54,127.5 89.96,127.5 cw(c89.96,124.96) 92.5,124.96 92.5,17.54 cw(c89.96,17.54) 89.96,15

## Keep-outs
Keep-Out Layer:
  the board outline again, w0.1

## Other copper
Top Layer:
  rectangle net GND: 43.182,26.241 44.232,29.491
  region net NetJ17_1: 48.8,55.106 48.3,55.106 48.3,54.595 48.8,54.595
  region net GND: 86.758,56.491 85.708,56.491 85.708,53.241 86.758,53.241
  region net GND: 87.818,29.439 86.768,29.439 86.768,26.189 87.818,26.189
  region net GND: 88.818,25.759 87.768,25.759 87.768,22.509 88.818,22.509
  region net GND: 85.738,52.811 84.688,52.811 84.688,49.561 85.738,49.561
  region net NetJ17_1: 48.575,55.545 47.8,55.545 47.8,54.135 48.575,54.135
  region net NetJ14_1: 48.575,28.545 44.67,28.545 44.67,27.135 48.575,27.135
  region net NetJ12_1: 48.575,24.865 45.67,24.865 45.67,23.455 48.575,23.455
  rectangle net GND: 44.182,22.561 45.232,25.811
  rectangle net GND: 45.242,49.509 46.292,52.759
  region net NetJ16_1: 48.575,51.865 46.73,51.865 46.73,50.455 48.575,50.455
  rectangle net GND: 46.262,53.189 47.312,56.439
  region net NetJ12_1: 48.8,24.405 47.917,24.405 47.917,23.894 48.8,23.894
  region net NetJ14_1: 48.8,28.106 47.917,28.106 47.917,27.595 48.8,27.595
  region net NetJ16_1: 48.8,51.405 47.917,51.405 47.917,50.894 48.8,50.894
  region net GND: 87.818,111.689 86.768,111.689 86.768,108.439 87.818,108.439
  rectangle net NetJ3_1: 83.425,109.385 86.33,110.795
  rectangle net NetJ5_1: 83.425,105.705 87.33,107.115
  rectangle net NetJ5_1: 83.2,106.144 83.775,106.655
  rectangle net NetJ3_1: 83.2,109.845 83.775,110.356
  region net GND: 88.818,108.009 87.768,108.009 87.768,104.759 88.818,104.759
  region net NetJ4_1: 48.575,110.045 47.8,110.045 47.8,108.635 48.575,108.635
  rectangle net NetJ6_1: 83.2,81.595 84.083,82.106
  rectangle net NetJ6_1: 83.425,81.135 88.33,82.545
  region net NetJ2_1: 48.8,105.905 47.917,105.905 47.917,105.394 48.8,105.394
  region net NetJ2_1: 48.575,106.365 46.73,106.365 46.73,104.955 48.575,104.955
  region net NetJ7_1: 48.8,78.405 47.917,78.405 47.917,77.894 48.8,77.894
  region net NetJ7_1: 48.575,78.865 41.77,78.865 41.77,77.455 48.575,77.455
  region net NetJ9_1: 48.8,82.106 47.917,82.106 47.917,81.595 48.8,81.595
  region net NetJ9_1: 48.575,82.545 40.77,82.545 40.77,81.135 48.575,81.135
  region net NetJ4_1: 48.8,109.606 48.225,109.606 48.225,109.095 48.8,109.095
  rectangle net NetJ8_1: 83.2,77.894 84.083,78.405
  rectangle net GND: 40.282,76.509 41.332,79.759
  rectangle net GND: 39.282,80.189 40.332,83.439
  rectangle net GND: 45.242,104.009 46.292,107.259
  rectangle net GND: 46.262,107.689 47.312,110.939
  region net GND: 89.818,83.439 88.768,83.439 88.768,80.189 89.818,80.189
  rectangle net NetJ8_1: 83.425,77.455 89.23,78.865
  region net GND: 90.718,79.759 89.668,79.759 89.668,76.509 90.718,76.509
  text "Ścieżka koplanarna (RO4350 0.254 mm): szerokość 0,49 mm / odstęp 0,35 mm" at 215.265,139.319 h1.52

## Silkscreen, mask and mechanical layers (free items; w line width, h text height)
Top Overlay:
  lines w0.55: 65,67.15 65,64.3 ccw(c66,64.3) 66,63.3 73.85,63.3 ccw(c73.85,64.3) 74.85,64.3 74.85,67.2 ccw(c73.85,67.2) 73.85,68.2 68.5,68.2 ; 65,67.2 cw(c66,67.2) 66,68.2
  text "VEE" at 72.5,123.233 h1 r270
  text "GND" at 82.6,123.233 h1 r270
  text "NC" at 56.755,122.3 h1.25 r270
  text "GND" at 59.295,122.3 h1.25 r270
  text "B A" at 61.835,122.3 h1.25 r270
  text "D C" at 64.375,122.3 h1.25 r270
  text "F E" at 66.915,122.3 h1.25 r270
  text "H G" at 69.455,122.3 h1.25 r270
  text "3 mm" at 81,118.45 h1.25
  text "1 mm" at 46.525,117.725 h1.25
  text "H" at 90.967,107.625 h1.25
  text "A" at 38.6,106.875 h1.25
  text "4 mm" at 80.875,96.05 h1.25
  text "2 mm" at 46.625,95.975 h1.25
  text "NB7V33MMNG" at 58.254,93.154 h1.52
  text "8 mm" at 46.5,90.35 h1.25
  text "5 mm" at 81.1,90.3 h1.25
  text "B" at 38.6,79.375 h1.25
  text "G" at 90.967,79.375 h1.25
  text "ABPG v 1.1" at 58.254,69.754 h1.52
  text "7 mm" at 46.125,68.5 h1.25
  text "6 mm" at 81,68.5 h1.25
  text "ise" at 66.6,63.95 h7
  text "1 mm" at 46.525,63.225 h1.25
  text "2 mm" at 80.925,63.225 h1.25
  text "C" at 38.6,52.375 h1.25
  text "F" at 90.967,52.375 h1.25
  text "2 mm" at 46.625,41.475 h1.25
  text "1 mm" at 81.025,41.475 h1.25
  text "SY58051AU" at 59.425,36.938 h1.52
  text "4 mm" at 46.525,36.225 h1.25
  text "3 mm" at 80.925,36.225 h1.25
  text "D" at 38.6,25.375 h1.25
  text "E" at 90.967,25.375 h1.25
  text "4 mm" at 73,16.6 h1.25
  text "3 mm" at 54.7,16.4 h1.25
Bottom Overlay:
  text "GND" at 85.762,123.731 h1.52 r90
  text "VEE" at 73.562,123.531 h1.52 r90
Top Solder:
  region: 88,25.7 81.65,25.7 81.65,22.6 88,22.6
  region: 87,29.4 81.65,29.4 81.65,26.3 87,26.3
  region: 86,56.4 81.65,56.4 81.65,53.4 86,53.4
  region: 84.9,52.7 81.65,52.7 81.65,49.7 84.9,49.7
  rectangle: 47,53.125 50.35,56.575
  rectangle: 46,49.425 50.35,52.875
  rectangle: 45,22.425 50.35,25.875
  rectangle: 43.975,26.125 50.35,29.575
  region: 88.025,108.15 82.65,108.15 82.65,104.675 88.025,104.675
  region: 87.025,111.825 82.6,111.825 82.6,108.375 87.025,108.375
  region: 89.025,83.575 82.65,83.575 82.65,80.125 89.025,80.125
  region: 89.925,79.9 82.65,79.9 82.65,76.425 89.925,76.425
  rectangle: 41.05,76.425 49.35,79.9
  rectangle: 40.05,80.125 49.35,83.575
  rectangle: 46.025,103.97 49.35,107.46
  rectangle: 47.05,107.65 49.35,110.925
  lines w0.1: 41.57,78.16 50.39,78.16
  lines w2: 41.175,81.84 50.39,81.84 cw(c50.39,78.774) 52.558,80.942 53.073,80.427 ccw(c53.5,80.854) 53.5,80.25 ; 42.2,78.16 50.39,78.16 ccw(c50.39,81.226) 52.558,79.058 53.073,79.573 cw(c53.5,79.146) 53.5,79.75 ; 47.075,105.66 50.39,105.66 ccw(c50.39,108.726) 52.558,106.558 53.073,107.073 cw(c53.5,106.646) 53.5,107.25 ; 48.125,109.34 50.39,109.34 cw(c50.39,106.274) 52.558,108.442 53.073,107.927 ccw(c53.5,108.354) 53.5,107.75 ; 48.775,73 48.775,77.95 ; 48.775,100.5 48.775,105.45 ; 48.8,27.84 50.39,27.84 ; 48.825,19 48.825,23.95 ; 48.825,28.05 48.825,33 ; 48.825,46 48.825,50.95 ; 48.825,55.05 48.825,60 ; 48.825,82.05 48.825,87 ; 48.825,109.55 48.825,114.5 ; 50.69,24.26 ccw(c50.69,27.326) 52.858,25.158 ; 50.69,27.74 cw(c50.69,24.674) 52.858,26.842 ; 50.69,51.26 ccw(c50.69,54.326) 52.858,52.158 ; 50.69,54.74 cw(c50.69,51.674) 52.858,53.842 ; 78.5,79.75 cw(c78.5,79.146) 78.927,79.573 79.442,79.058 ccw(c81.61,81.226) 81.61,78.16 88.875,78.16 ; 78.5,80.25 ccw(c78.5,80.854) 78.927,80.427 79.442,80.942 cw(c81.61,78.774) 81.61,81.84 88,81.84 ; 78.5,108 cw(c78.5,107.396) 78.927,107.823 79.442,107.308 ccw(c81.61,109.476) 81.61,106.41 86.975,106.41 ; 78.5,108.5 ccw(c78.5,109.104) 78.927,108.677 79.442,109.192 cw(c81.61,107.024) 81.61,110.09 85.975,110.09 ; 79.142,25.158 ccw(c81.31,27.326) 81.31,24.26 ; 79.142,26.842 cw(c81.31,24.674) 81.31,27.74 ; 79.142,52.158 ccw(c81.31,54.326) 81.31,51.26 ; 79.142,53.842 cw(c81.31,51.674) 81.31,54.74 ; 83.175,19 83.175,23.95 ; 83.175,28.05 83.175,33 ; 83.175,46 83.175,50.95 ; 83.175,55.05 83.175,60 ; 83.175,73 83.175,77.95 ; 83.175,100.7 83.175,105.65 ; 83.225,82.05 83.225,87 ; 83.225,110.15 83.225,115.1